# Altium PCB PCB3.PcbDoc (part 1 of 2)
Units mm, origin at the board's own origin, x right, y up, seen from the top; angles counter-clockwise.
Board outline 125 x 125 mm, 2 copper layers (Top Layer, Bottom Layer); 180 components, 111 nets, 575 pads, 155 vias.
Unrouted connection lines stored in the file: 143.
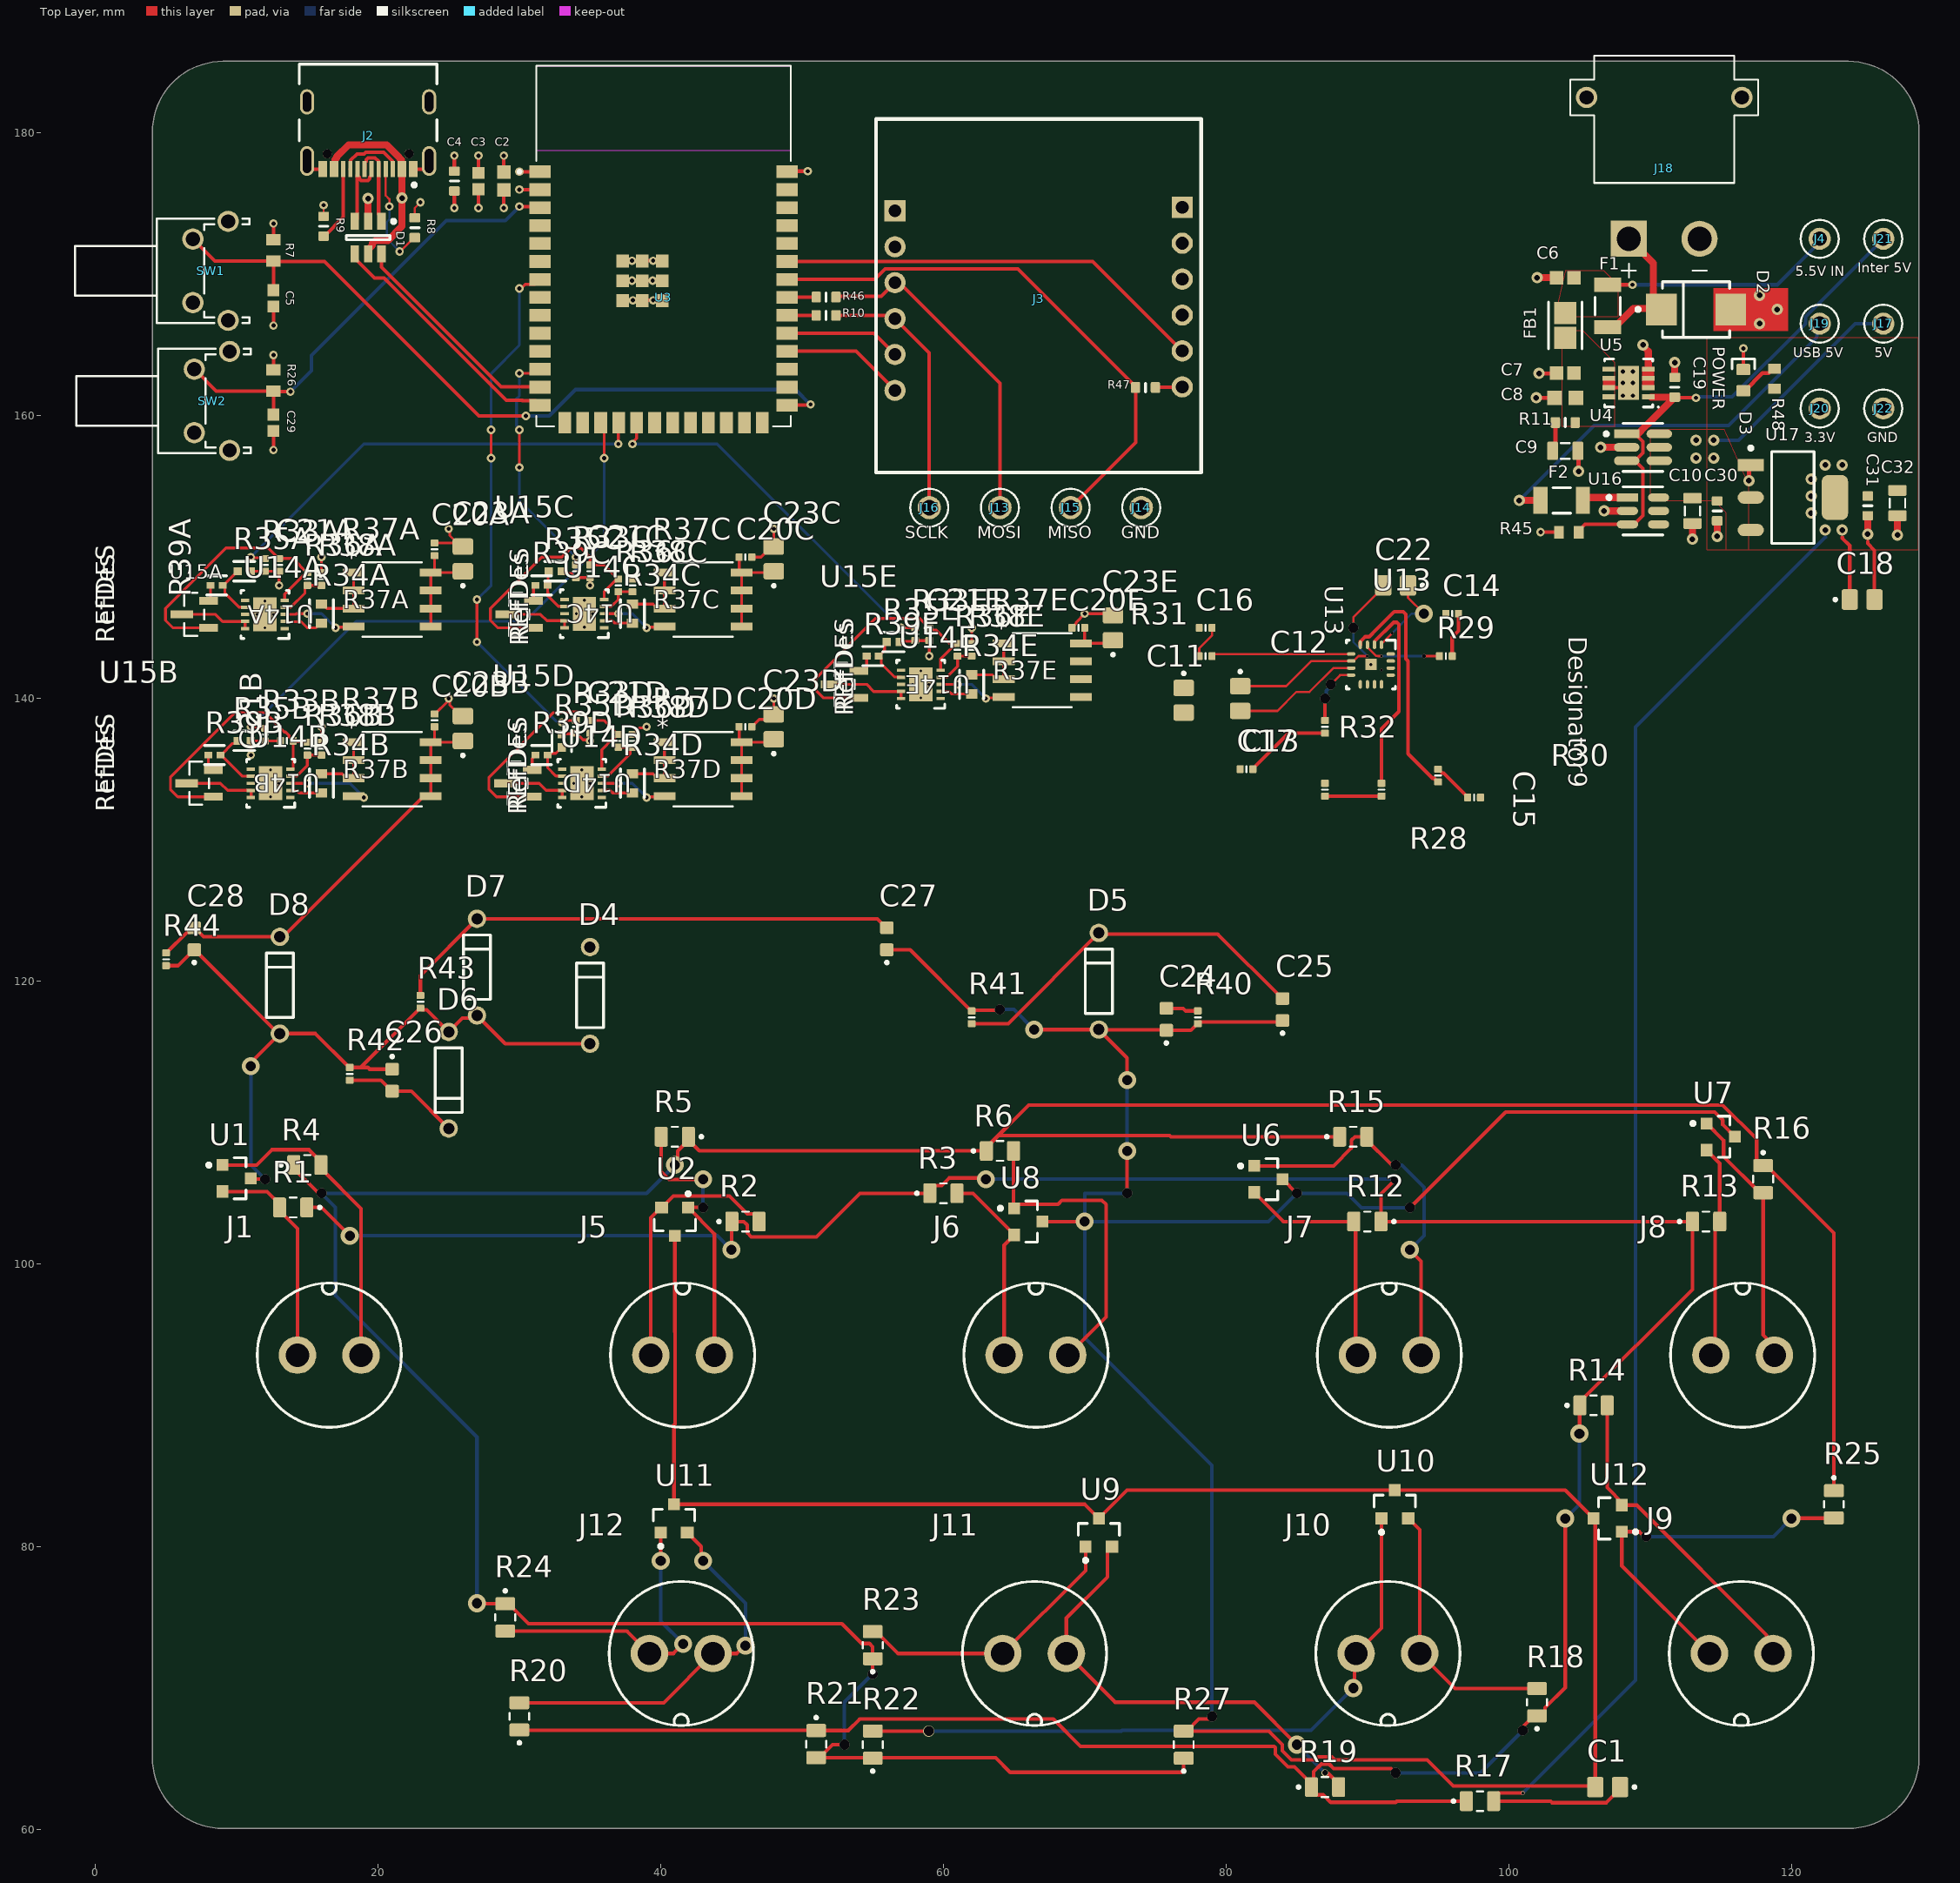
[diagram p0: Top Layer view]
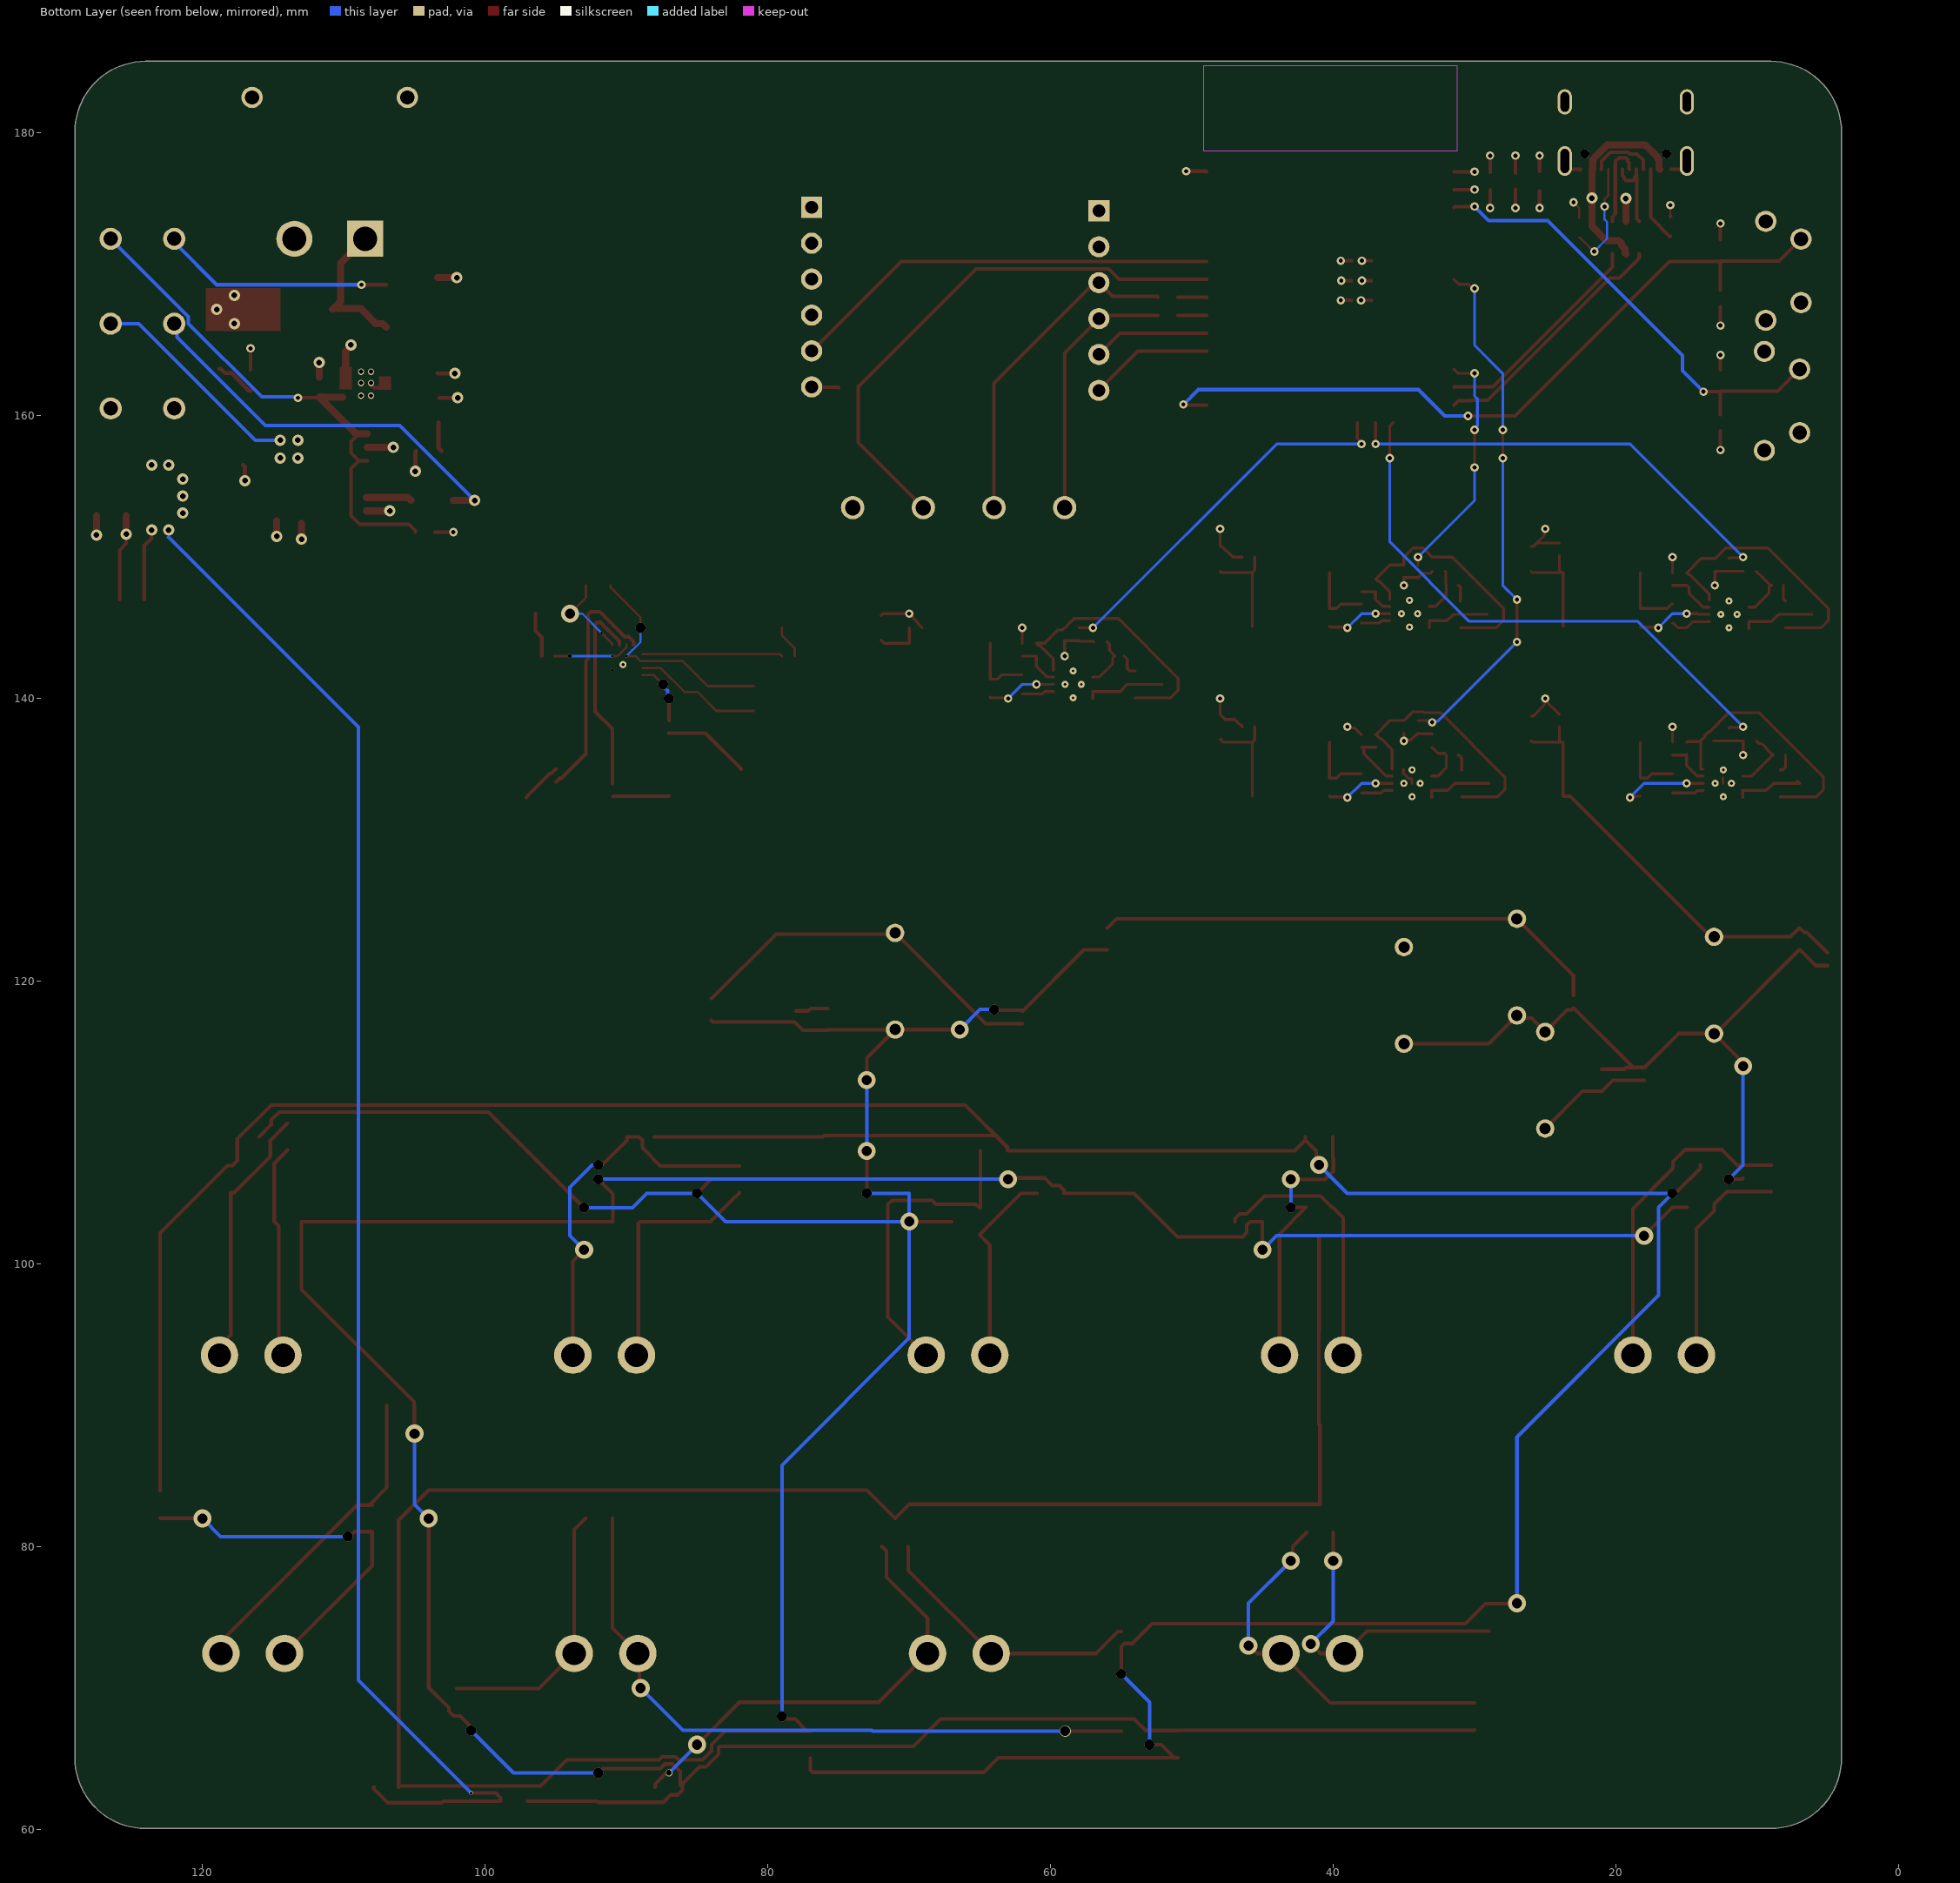
[diagram p1: Bottom Layer view, seen from below]

## Layer stack, top to bottom
Top Solder: solder mask 0.0102, Solder Resist, Dk 3.5
Top Layer: signal copper 0.0356
Dielectric 1: dielectric 0.32, FR-4, Dk 4.8
Bottom Layer: signal copper 0.0356
Bottom Solder: solder mask 0.0102, Solder Resist, Dk 3.5

## Board outline
4.032,65.071 4.032,180.071 cw(c9.032,180.071) 9.032,185.071 124.032,185.071 cw(c124.032,180.071) 129.032,180.071 129.032,65.071 cw(c124.032,65.071) 124.032,60.071 9.032,60.071 cw(c9.032,65.071)

## Design rules (kind name [scope] priority, off if disabled: settings)
Clearance U13 [InComponent('U13')] p1: gap=0.14 ignorepadtopadclearanceinfootprint=FALSE
Clearance [All] p2: gap=0.254 ignorepadtopadclearanceinfootprint=FALSE
DiffPairsRouting [All] p1: maxlimit=0.254 minlimit=0.254 mostfreqgap=0.254 toplayer_minwidth=0.381 toplayer_maxwidth=0.381 toplayer_prefwidth=0.381 bottomlayer_minwidth=0.381 bottomlayer_maxwidth=0.381 bottomlayer_prefwidth=0.381 maxuncoupledlength=12.7
FanoutControl Fanout_Default [All] p1: bgadir=Out bgaviamode=Centered fanoutstyle=Auto fanoutdirection=Alternating viagrid=0.025 // Fanout_Default (Default Rule)
FanoutControl Fanout_Small [(CompPinCount < 5)] p2: bgadir=Out bgaviamode=Centered fanoutstyle=Auto fanoutdirection=OutThenIn viagrid=0.025 // Fanout_Small (Default Rule)
FanoutControl Fanout_LCC [IsLCC] p4: bgadir=Out bgaviamode=Centered fanoutstyle=Auto fanoutdirection=Alternating viagrid=0.025 // Fanout_LCC (Default Rule)
FanoutControl Fanout_BGA [IsBGA] p5: bgadir=Out bgaviamode=Centered fanoutstyle=Auto fanoutdirection=Alternating viagrid=0.025 // Fanout_BGA (Default Rule)
PolygonConnect [All] p1: connectstyle=Relief reliefconductorwidth=0.254 reliefentries=4 polygonreliefangle="90 Angle" airgapwidth=0.254
RoutingVias [All] p1: holewidth=0.711 width=1.27 viastyle="Through Hole" minholewidth=0.711 minwidth=1.27 maxholewidth=0.711 maxwidth=1.27
SolderMaskExpansion [All] p1: expansion=0 istentingtop=FALSE
SupplyNets "Schematic Supply Nets_10" [InNet('GND')] p1: voltage=0.000
SupplyNets "Schematic Supply Nets_1" [InNet('5V')] p2: voltage=0.000
SupplyNets "Schematic Supply Nets_2" [InNet('24V')] p3: voltage=0.000
SupplyNets "Schematic Supply Nets_3" [InNet('5V5_IN')] p4: voltage=0.000
SupplyNets "Schematic Supply Nets_4" [InNet('USB_5V')] p5: voltage=0.000
SupplyNets "Schematic Supply Nets_5" [InNet('5V5')] p6: voltage=0.000
SupplyNets "Schematic Supply Nets_6" [InNet('+5')] p7: voltage=0.000
SupplyNets "Schematic Supply Nets_7" [InNet('+5V')] p8: voltage=0.000
SupplyNets "Schematic Supply Nets_8" [InNet('5V_INTER')] p9: voltage=0.000
SupplyNets "Schematic Supply Nets_9" [InNet('3.3V')] p10: voltage=0.000
Width [All] p1: maxlimit=0.254 minlimit=0.15 preferedwidth=0.16 minimp=50.000000 maximp=50.000000 favimp=50.000000
25 further rules are at their usual default settings.

## Classes and differential pairs
channel class MD-XTR-MOSFET: Designator1 Designator2 Designator3 Designator4 Designator5
component class U_Sheet1: C2 C3 C4 C5 C29 D1 J2 J3 J13 J14 J15 J16 R7 R8 R9 R10 R26 R46 R47 SW1 SW2 U3
component class Designator: C24 C25 C26 C27 C28 D4 D5 D6 D7 D8 R40 R41 R42 R43 R44
component class Designator5: C20E C21E C23E R33E R34E R35E R36E R37E R38E R39E U14E U15E
component class Designator4: C20D C21D C23D R33D R34D R35D R36D R37D R38D R39D U14D U15D
component class Designator3: C20C C21C C23C R33C R34C R35C R36C R37C R38C R39C U14C U15C
component class Designator2: C20B C21B C23B R33B R34B R35B R36B R37B R38B R39B U14B U15B
component class Designator1: C20A C21A C23A R33A R34A R35A R36A R37A R38A R39A U14A U15A
differential pair USB_D: +USB_D_P -USB_D_N

## Components (designator, comment, footprint, x,y, rotation, side; value= is the part's Value field where it differs from the comment)
C1 "Capacitor 220pF, 5%, 50V, C0G, 0805" PCC-001-0015-1 107,63 r180 top value=100nF
C2 "Capacitor 100 nF +/-10% 50 V 0603" CAPC1608X90X40NL10T20 28.9,176.6 r270 top value=100nF
C3 "Capacitor 1 uF +/- 10% 25 V 0603" CAPC1608X90X40LL10T20 27.1,176.6 r270 top value=1µF
C4 "Capacitor 10µF +/-20% 10V 0603" CAPC0603(1608)100_L 25.4,176.6 r270 top value=10µF
C5 "Capacitor 1 uF +/- 10% 25 V 0603" CAPC1608X90X40LL10T20 12.6,168.3 r270 top value=1µF
C6 "Capacitor 100 nF +/-10% 50 V 0603" CAPC1608X90X40NL10T20 104,169.767 r180 top value=100nF
C7 "Capacitor 100 nF +/-10% 50 V 0603" CAPC1608X90X40NL10T20 104,163.017 r180 top value=100nF
C8 "Capacitor 1 uF +/- 10% 16 V 0603" CAPC1608X94X35NL15T15 104,161.267 r180 top value=1µF
C9 "Capacitor 22µF +/-40% 16V 0805" CAPC0805(2012)145_L 104,157.517 r0 top value=22µF
C10 "Capacitor 22µF +/-40% 16V 0805" CAPC0805(2012)145_L 113,153.267 r270 top value=22µF
C11 "Capacitor 15uF, 20%, 35V, X5R, 0805" PCC-001-0015-1 77,139.875 r270 top value=100nF
C12 "Capacitor 15uF, 20%, 35V, X5R, 0805" PCC-001-0015-1 81,140 r270 top value=10uF
C13 "Capacitor 10nF +/-20% 50V 0402" CAPC0402(1005)60_L 87,133.55 r90 top value=10nF
C14 "Capacitor 10nF +/-20% 50V 0402" CAPC0402(1005)60_L 96,146 r180 top value=10nF
C15 "Capacitor 10nF +/-20% 50V 0402" CAPC0402(1005)60_L 97.55,133 r0 top value=10nF
C16 "Capacitor 10nF +/-20% 50V 0402" CAPC0402(1005)60_L 78.55,145 r180 top value=10nF
C17 "Capacitor 10nF +/-20% 50V 0402" CAPC0402(1005)60_L 81.45,135 r180 top value=10nF
C18 "Capacitor 15uF, 20%, 35V, X5R, 0805" PCC-001-0015-1 125,147 r0 top value=100nF
C19 "Capacitor 1µF +/-40% 50V 0603" CAPC0603(1608)100_L 111.75,162.017 r90 top value=1µF
C20A "Capacitor 10nF +/-20% 50V 0402" CAPC0402(1005)60_L 24,150.55 r90 top value=10nF (schematic designator C20)
C20B "Capacitor 10nF +/-20% 50V 0402" CAPC0402(1005)60_L 24,138.45 r90 top value=10nF (schematic designator C20)
C20C "Capacitor 10nF +/-20% 50V 0402" CAPC0402(1005)60_L 46,150 r0 top value=10nF (schematic designator C20)
C20D "Capacitor 10nF +/-20% 50V 0402" CAPC0402(1005)60_L 46,138 r0 top value=10nF (schematic designator C20)
C20E "Capacitor 10nF +/-20% 50V 0402" CAPC0402(1005)60_L 69.55,145 r180 top value=10nF (schematic designator C20)
C21A "Capacitor 470nF +/-40% 10V 0402" CAPC0402(1005)60_L 13,149.45 r270 top value=470nF (schematic designator C21)
C21B "Capacitor 470nF +/-40% 10V 0402" CAPC0402(1005)60_L 13.55,137 r180 top value=470nF (schematic designator C21)
C21C "Capacitor 470nF +/-40% 10V 0402" CAPC0402(1005)60_L 35,149 r270 top value=470nF (schematic designator C21)
C21D "Capacitor 470nF +/-40% 10V 0402" CAPC0402(1005)60_L 35,138 r270 top value=470nF (schematic designator C21)
C21E "Capacitor 470nF +/-40% 10V 0402" CAPC0402(1005)60_L 59,144.55 r270 top value=470nF (schematic designator C21)
C22 "Capacitor 15uF, 20%, 35V, X5R, 0805" PCC-001-0015-1 92,148 r180 top value=1uF
C23A "Capacitor 15uF, 20%, 35V, X5R, 0805" PCC-001-0015-1 26,149.875 r90 top value=100nF (schematic designator C23)
C23B "Capacitor 15uF, 20%, 35V, X5R, 0805" PCC-001-0015-1 26,137.875 r90 top value=100nF (schematic designator C23)
C23C "Capacitor 15uF, 20%, 35V, X5R, 0805" PCC-001-0015-1 48,149.875 r90 top value=100nF (schematic designator C23)
C23D "Capacitor 15uF, 20%, 35V, X5R, 0805" PCC-001-0015-1 48,138 r90 top value=100nF (schematic designator C23)
C23E "Capacitor 15uF, 20%, 35V, X5R, 0805" PCC-001-0015-1 72,145 r90 top value=100nF (schematic designator C23)
C24 "Capacitor 82pF, 5%, 50V, C0G, 0603" PCC-001-0014-1 75.777,117.305 r90 top value=100nF
C25 "Capacitor 82pF, 5%, 50V, C0G, 0603" PCC-001-0014-1 84,118 r90 top value=100nF
C26 "Capacitor 82pF, 5%, 50V, C0G, 0603" PCC-001-0014-1 21,113 r270 top value=100nF
C27 "Capacitor 82pF, 5%, 50V, C0G, 0603" PCC-001-0014-1 56,123 r90 top value=100nF
C28 "Capacitor 82pF, 5%, 50V, C0G, 0603" PCC-001-0014-1 7,123 r90 top value=100nF
C29 "Capacitor 1 uF +/- 10% 25 V 0603" CAPC1608X90X40LL10T20 12.6,159.5 r270 top value=1µF
C30 "Capacitor 1µF +/-40% 50V 0603" CAPC0603(1608)100_L 114.75,153.267 r270 top value=1µF
C31 "Capacitor 1µF +/-40% 50V 0603" CAPC0603(1608)100_L 125.403,153.626 r270 top value=1µF
C32 "Capacitor 22µF +/-40% 16V 0805" CAPC0805(2012)145_L 127.5,153.817 r270 top value=22µF
D1 "USBLC6-2SC6" STM-SOT23-6L_V 19.3,172.6 r270 top
D2 "SMBJ6.0A" FP-SMBJ-MFG 113.25,167.517 r0 top
D3 "LED_0603_RED" LED_0603_RED 116.6,162.517 r270 top
D4 "BZX79C3V6" FAIR-DO-35-2 35,119 r90 top
D5 "BZX79C3V6" FAIR-DO-35-2 71,120 r90 top
D6 "BZX79C3V6" FAIR-DO-35-2 25,113 r270 top
D7 "BZX79C3V6" FAIR-DO-35-2 27,121 r90 top
D8 "BZX79C3V6" FAIR-DO-35-2 13.055,119.718 r90 top
F1 "0ZCJ0050FF2G" FP-0ZCJ0050FF2G-MFG 107,167.767 r90 top
F2 "0ZCJ0050FF2G" FP-0ZCJ0050FF2G-MFG 103.75,154.017 r0 top
FB1 "MPZ2012S331AT000" FP-MPZ2012-IPC_A 104,166.391 r270 top value=50mΩ
J1 "GX12-2 Jack" PCC-001-0161-1 16.55,93.55 r0 top
J2 "USB4105-GF-A" FP-USB4105-GF-A-MFG 19.295,181.035 r180 top
J3 "W5500 SPI to LAN Breakout" "W5500 SPI to LAN Breakout-Footprint-1" 55.24,155.995 r0 top
J4 "5001" FP-5001-MFG#1 122,172.517 r0 top
J5 "GX12-2 Jack" PCC-001-0161-1 41.55,93.55 r0 top
J6 "GX12-2 Jack" PCC-001-0161-1 66.55,93.55 r0 top
J7 "GX12-2 Jack" PCC-001-0161-1 91.55,93.55 r0 top
J8 "GX12-2 Jack" PCC-001-0161-1 116.55,93.55 r0 top
J9 "GX12-2 Jack" PCC-001-0161-1 116.45,72.45 r180 top
J10 "GX12-2 Jack" PCC-001-0161-1 91.45,72.45 r180 top
J11 "GX12-2 Jack" PCC-001-0161-1 66.45,72.45 r180 top
J12 "GX12-2 Jack" PCC-001-0161-1 41.45,72.45 r180 top
J13 "5001" FP-5001-MFG#2 64,153.5 r0 top
J14 "5001" FP-5001-MFG#2 74,153.5 r0 top
J15 "5001" FP-5001-MFG#2 69,153.5 r0 top
J16 "5001" FP-5001-MFG#2 59,153.5 r0 top
J17 "5001" FP-5001-MFG#1 126.5,166.517 r0 top
J18 "XT30PW-M" AMASS_XT30PW-M 111,182.517 r0 top
J19 "5001" FP-5001-MFG#1 122,166.517 r0 top
J20 "5001" FP-5001-MFG#1 122,160.517 r0 top
J21 "5001" FP-5001-MFG#1 126.5,172.517 r0 top
J22 "5001" FP-5001-MFG#1 126.5,160.517 r0 top
R1 "Resistor 750R, 0.1%, 1/8W, 0805" PCC-001-0067-1 14,104 r180 top value=10
R2 "Resistor 750R, 0.1%, 1/8W, 0805" PCC-001-0067-1 46,103 r0 top value=10
R3 "Resistor 750R, 0.1%, 1/8W, 0805" PCC-001-0067-1 60,105 r0 top value=10
R4 "Resistor 750R, 0.1%, 1/8W, 0805" PCC-001-0067-1 15,107 r0 top value=10
R5 "Resistor 750R, 0.1%, 1/8W, 0805" PCC-001-0067-1 41,109 r180 top value=10
R6 "Resistor 750R, 0.1%, 1/8W, 0805" PCC-001-0067-1 64,108 r0 top value=10
R7 "Resistor 10k +/-1% 0603 100 mW" RESC1608X55X25ML10T15 12.6,171.7 r90 top value=10k
R8 "Resistor 5.1k +/-1% 0603 100 mW" RESC0603(1608)_L 22.6,173.3 r90 top value=5K1
R9 "Resistor 5.1k +/-1% 0603 100 mW" RESC0603(1608)_L 16.15,173.4 r90 top value=5K1
R10 "0R3J" RESC0603(1608)_L 51.7,167.1 r180 top value=0
R11 "0R3J" RESC0603(1608)_L 104,159.517 r180 top value=0
R12 "Resistor 750R, 0.1%, 1/8W, 0805" PCC-001-0067-1 90,103 r180 top value=10
R13 "Resistor 750R, 0.1%, 1/8W, 0805" PCC-001-0067-1 113.963,103 r0 top value=10
R14 "Resistor 750R, 0.1%, 1/8W, 0805" PCC-001-0067-1 106,90 r0 top value=10
R15 "Resistor 750R, 0.1%, 1/8W, 0805" PCC-001-0067-1 89,109 r0 top value=10
R16 "Resistor 750R, 0.1%, 1/8W, 0805" PCC-001-0067-1 118,106 r270 top value=10
R17 "Resistor 750R, 0.1%, 1/8W, 0805" PCC-001-0067-1 97.962,62 r0 top value=1k
R18 "Resistor 750R, 0.1%, 1/8W, 0805" PCC-001-0067-1 102,69 r90 top value=10
R19 "Resistor 750R, 0.1%, 1/8W, 0805" PCC-001-0067-1 87,63 r0 top value=10
R20 "Resistor 750R, 0.1%, 1/8W, 0805" PCC-001-0067-1 30,68 r90 top value=10
R21 "Resistor 750R, 0.1%, 1/8W, 0805" PCC-001-0067-1 51,66.038 r270 top value=120
R22 "Resistor 750R, 0.1%, 1/8W, 0805" PCC-001-0067-1 55,66 r90 top value=10
R23 "Resistor 750R, 0.1%, 1/8W, 0805" PCC-001-0067-1 55,73.037 r90 top value=10
R24 "Resistor 750R, 0.1%, 1/8W, 0805" PCC-001-0067-1 29,75 r270 top value=10
R25 "Resistor 750R, 0.1%, 1/8W, 0805" PCC-001-0067-1 123,83 r270 top value=10
R26 "Resistor 10k +/-1% 0603 100 mW" RESC1608X55X25ML10T15 12.6,162.5 r90 top value=10k
R27 "Resistor 750R, 0.1%, 1/8W, 0805" PCC-001-0067-1 77,66 r90 top value=1k
R28 "Resistor 1K +/-5 % 0402 63 mW" RESC0402(1005)_L 91,133.55 r270 top value=1k
R29 "Resistor 1K +/-5 % 0402 63 mW" RESC0402(1005)_L 95.55,143 r0 top value=1k
R30 "Resistor 1K +/-5 % 0402 63 mW" RESC0402(1005)_L 95,134.55 r90 top value=1k
R31 "Resistor 1K +/-5 % 0402 63 mW" RESC0402(1005)_L 78.55,143 r180 top value=1k
R32 "Resistor 1K +/-5 % 0402 63 mW" RESC0402(1005)_L 87,138 r270 top value=1k
R33A "10KR2F" RESC0402(1005)_L 12,149.45 r90 top value=10k (schematic designator R33)
R33B "10KR2F" RESC0402(1005)_L 12,137.45 r90 top value=10k (schematic designator R33)
R33C "10KR2F" RESC0402(1005)_L 34,149 r90 top value=10k (schematic designator R33)
R33D "10KR2F" RESC0402(1005)_L 34,138 r90 top value=10k (schematic designator R33)
R33E "10KR2F" RESC0402(1005)_L 58,144.55 r90 top value=10k (schematic designator R33)
R34A "15 ohm" FP-AF0603-IPC_C 16,146 r90 top (schematic designator R34)
R34B "15 ohm" FP-AF0603-IPC_C 16,134 r90 top (schematic designator R34)
R34C "15 ohm" FP-AF0603-IPC_C 38,146 r90 top (schematic designator R34)
R34D "15 ohm" FP-AF0603-IPC_C 38,134 r90 top (schematic designator R34)
R34E "15 ohm" FP-AF0603-IPC_C 62,141 r90 top (schematic designator R34)
R35A "2k ohm" FP-RN73R1E-IPC_B 10.536,149 r0 top (schematic designator R35)
R35B "2k ohm" FP-RN73R1E-IPC_B 10.536,137 r0 top (schematic designator R35)
R35C "2k ohm" FP-RN73R1E-IPC_B 32.536,149 r0 top (schematic designator R35)
R35D "2k ohm" FP-RN73R1E-IPC_B 33,137 r90 top (schematic designator R35)
R35E "2k ohm" FP-RN73R1E-IPC_B 56.464,144 r0 top (schematic designator R35)
R36A "Resistor 2K +/-5 % 0402 63 mW" RESC0402(1005)_L 15,148.45 r270 top value=2k (schematic designator R36)
R36B "Resistor 2K +/-5 % 0402 63 mW" RESC0402(1005)_L 15,136.45 r270 top value=2k (schematic designator R36)
R36C "Resistor 2K +/-5 % 0402 63 mW" RESC0402(1005)_L 37,148 r270 top value=2k (schematic designator R36)
R36D "Resistor 2K +/-5 % 0402 63 mW" RESC0402(1005)_L 37,137 r270 top value=2k (schematic designator R36)
R36E "Resistor 2K +/-5 % 0402 63 mW" RESC0402(1005)_L 61,143.45 r270 top value=2k (schematic designator R36)
R37A "RRH100P03GZETB" TRANS_RRH040P_ROM 21,147 r0 top (schematic designator R37)
R37B "RRH100P03GZETB" TRANS_RRH040P_ROM 21,135 r0 top (schematic designator R37)
R37C "RRH100P03GZETB" TRANS_RRH040P_ROM 43,147 r0 top (schematic designator R37)
R37D "RRH100P03GZETB" TRANS_RRH040P_ROM 43,135 r0 top (schematic designator R37)
R37E "RRH100P03GZETB" TRANS_RRH040P_ROM 67,142 r0 top (schematic designator R37)
R38A "Resistor 3K +/-1 % 0402 63 mW" RESC0402(1005)_L 16,148.45 r90 top value=3k (schematic designator R38)
R38B "Resistor 3K +/-1 % 0402 63 mW" RESC0402(1005)_L 16,136.45 r90 top value=3k (schematic designator R38)
R38C "Resistor 3K +/-1 % 0402 63 mW" RESC0402(1005)_L 38,148 r90 top value=3k (schematic designator R38)
R38D "Resistor 3K +/-1 % 0402 63 mW" RESC0402(1005)_L 38,137 r90 top value=3k (schematic designator R38)
R38E "Resistor 3K +/-1 % 0402 63 mW" RESC0402(1005)_L 62,143.45 r90 top value=3k (schematic designator R38)
R39A "820K ohm" FP-CRGP0402-IPC_C 8.574,148 r0 top value=820KΩ (schematic designator R39)
R39B "820K ohm" FP-CRGP0402-IPC_C 8.426,136 r0 top value=820KΩ (schematic designator R39)
R39C "820K ohm" FP-CRGP0402-IPC_C 31.574,148 r0 top value=820KΩ (schematic designator R39)
R39D "820K ohm" FP-CRGP0402-IPC_C 31.574,136 r0 top value=820KΩ (schematic designator R39)
R39E "820K ohm" FP-CRGP0402-IPC_C 55,143 r0 top value=820KΩ (schematic designator R39)
R40 "316KR2F" RESC0402(1005)_L 78,117.45 r90 top value=150
R41 "316KR2F" RESC0402(1005)_L 62,117.45 r270 top value=150
R42 "316KR2F" RESC0402(1005)_L 18,113.45 r270 top value=150
R43 "316KR2F" RESC0402(1005)_L 23,118.55 r90 top value=150
R44 "316KR2F" RESC0402(1005)_L 5,121.55 r90 top value=150
R45 "Resistor 100k +/-1% 0603 100 mW" RESC1608X55X25NL10T15 104.25,151.767 r180 top value=100k
R46 "0R3J" RESC0603(1608)_L 51.7,168.4 r180 top value=0
R47 "0R3J" RESC0603(1608)_L 74.3,162 r180 top value=0
R48 "Resistor 470R +/-1% 0603 100 mW" RESC1608X55X25NL10T15 118.8,162.617 r90 top value=470
SW1 "431256083716" 4312560837x6 6.025,170.25 r270 top
SW2 "431256083716" 4312560837x6 6.125,161.05 r270 top
U1 "PSM712-LF-T7" PRKT-SOT23-3_V 10,106.06 r0 top
U2 "PSM712-LF-T7" PRKT-SOT23-3_V 41,103 r270 top
U3 "ESP32-S3-WROOM-1-N16R2" XCVR_ESP32-S3-WROOM-1-N16R2 40.203,172.003 r0 top
U4 "TPS22917DBVR" FP-DBV0006A-IPC_A 109.5,157.767 r0 top
U5 "TPS7A2150PQWDRBRQ1" SON65P300X100_HS-9N 108.48,162.317 r180 top
U6 "PSM712-LF-T7" PRKT-SOT23-3_V 83,106 r0 top
U7 "PSM712-LF-T7" PRKT-SOT23-3_V 115,109 r0 top
U8 "PSM712-LF-T7" PRKT-SOT23-3_V 66,103 r0 top
U9 "PSM712-LF-T7" PRKT-SOT23-3_V 71,81 r90 top
U10 "PSM712-LF-T7" PRKT-SOT23-3_V 91.94,83 r90 top
U11 "PSM712-LF-T7" PRKT-SOT23-3_V 40.94,82 r90 top
U12 "PSM712-LF-T7" PRKT-SOT23-3_V 107,82 r180 top
U13 "DAC80508ZCRTER" RTE0016D 90.25,142.4 r270 top
U14A "XTR111AIDRCR" DRC0010A 12,145.95 r180 top (schematic designator U14)
U14B "XTR111AIDRCR" DRC0010A 12.4,134 r180 top (schematic designator U14)
U14C "XTR111AIDRCR" DRC0010A 34.6,146 r180 top (schematic designator U14)
U14D "XTR111AIDRCR" DRC0010A 34.425,134 r180 top (schematic designator U14)
U14E "XTR111AIDRCR" DRC0010A 58.4,141 r180 top (schematic designator U14)
U15A "REF3040AIDBZT" DBZ3 7,145.95 r90 top (schematic designator U15)
U15B "REF3040AIDBZT" DBZ3 7.346,134 r90 top (schematic designator U15)
U15C "REF3040AIDBZT" DBZ3 29.984,145.95 r90 top (schematic designator U15)
U15D "REF3040AIDBZT" DBZ3 29.883,134 r90 top (schematic designator U15)
U15E "REF3040AIDBZT" DBZ3 53,141 r90 top (schematic designator U15)
U16 "TPS22917LDBVR" FP-DBV0006A-IPC_B 109.5,153.267 r0 top
U17 "AZ1117CH-3.3TRG1" FP-SOT223-IPC_B 120.1,154.217 r0 top

## Footprints (in the part's own frame and the unit in brackets; to place one, negate y for a bottom-side part, rotate by r counter-clockwise, add the part's x,y. Pads: shape width x height; smd on the part's side, far side on the other; paste and mask are expansions set on the pad)
4312560837x6 [mm] "6x6mm right angle Tact Switch with ground terminal, THT version"
  round 1.5 hole 1: 1(-2.25,0.875) 2(2.25,0.875) G1(-3.5,3.375) G2(3.5,3.375)
  silkscreen extent -3.7,-7.48 3.7,4.87, body extent -4.2,-7.48 4.2,4.87, height 7.25
AMASS_XT30PW-M [mm]
  round 2.55 hole 1.7: N(2.5,-10)
  rect 2.55x2.55 / inner round 2.55 / far side rect 2.55x2.55 hole 1.7: P(-2.5,-10)
  round 1.508 hole 1: S1(5.5,0) S2(-5.5,0)
  silkscreen extent -6.65,-12.75 6.65,2.95, body extent -6.65,-11 6.65,2.95, height 5
CAPC0402(1005)60_L [mm] "Chip Capacitor, Body 1.0x0.5mm, Height 0.6mm, IPC High Density"
  rrect25% 0.5x0.55 smd: 1(-0.45,0) 2(0.45,0)
  silkscreen extent 0,-0.2 0,0.2, body extent -0.5,-0.25 0.5,0.25, height 0.6
CAPC0603(1608)100_L [mm] "Chip Capacitor, Body 1.6x0.8mm, Height 1.0mm, IPC High Density"
  rrect25% 0.66x0.76 smd: 1(-0.7,0) 2(0.7,0)
  silkscreen extent 0,-0.3 0,0.3, body extent -0.8,-0.4 0.8,0.4, height 0.95
CAPC0805(2012)145_L [mm] "Chip Capacitor, Body 2.0x1.2mm, Height 1.45mm, IPC High Density"
  rrect25% 0.76x1.3 smd: 1(-0.9,0) 2(0.89,0)
  silkscreen extent -0.3,-0.55 0.3,0.55, body extent -1,-0.6 1,0.6, height 1.45
CAPC1608X90X40LL10T20 [mm] "Chip Capacitor, 2-Leads, Body 1.70x0.90mm, IPC High Density"
  rect 0.85x0.85 smd: 1(-0.575,0) 2(0.575,0)
  body extent -0.85,-0.45 0.85,0.45, height 0.9
CAPC1608X90X40NL10T20 [mm] "Chip Capacitor, 2-Leads, Body 1.70x0.90mm, IPC Medium Density"
  rect 0.95x0.95 smd: 1(-0.625,0) 2(0.625,0)
  body extent -0.85,-0.45 0.85,0.45, height 0.9
CAPC1608X94X35NL15T15 [mm] "Chip Capacitor, 2-Leads, Body 1.75x0.96mm, IPC Medium Density"
  rect 1.05x1 smd: 1(-0.75,0) 2(0.75,0)
  body extent -0.87,-0.48 0.87,0.48, height 0.94
DBZ3 [mil]
  rect 22x52 smd paste-26 mask-26: 1(-37.4,-40) 2(37.4,-40)
  rect 22x62.5 smd paste-31.25 mask-31: 3(0,34.75)
  silkscreen extent -60,-28 60,28, body extent -60,-27 60,27, height 44
DRC0010A [mm]
  rect 0.6x0.24 smd paste+0 mask+0.051: 1(-1.4,1) 2(-1.4,0.5) 3(-1.4,0) 4(-1.4,-0.5) 5(-1.4,-1) 6(1.4,-1) 7(1.4,-0.5) 8(1.4,0) 9(1.4,0.5) 10(1.4,1)
  rect 1.65x2.4 smd paste-1.187 mask+0.051: 11(0,0)
  round 0.5 hole 0.203 paste-2539.97 mask+0.051: V(-0.575,0) V(0,0.95) V(0,-0.95) V(0.575,0)
  silkscreen extent -1.7,-1.7 1.7,1.7
FAIR-DO-35-2 [mm] "TH, 2-Leads, Dia 1.91mm"
  round 1.3 hole 0.8: 1(-3.42,0) 2(3.42,0)
  silkscreen extent -2.28,-0.95 2.28,0.95, body extent -3.7,-0.95 3.7,0.95, height 1.91
FP-0ZCJ0050FF2G-MFG [mm]
  rect 1x1.9 smd paste+0 mask+0: 1(-1.5,0) 2(1.5,0)
  silkscreen extent -0.63,-0.9 0.63,0.9, body extent -2.1,-1.05 2.1,1.05, height 0.25
FP-5001-MFG#1 [mm]
  round 1.57 hole 1.016 paste-2539.97 mask+0: 1(0,0)
  silkscreen extent -1.35,-1.34 1.35,1.34, body extent -1.45,-1.45 1.45,1.45, height 0.25
FP-5001-MFG#2 [mm]
  round 1.651 hole 1.092 paste-2539.97 mask+0: 1(0,0)
  silkscreen extent -1.35,-1.34 1.35,1.34, body extent -1.45,-1.45 1.45,1.45, height 0.25
FP-AF0603-IPC_C [mm]
  rect 0.659x0.812 smd paste+0 mask+0: 1(-0.677,0) 2(0.677,0)
  silkscreen extent -1.01,-0.85 1.01,0.85, body extent -1.11,-0.55 1.11,0.55, height 0.25
FP-CRGP0402-IPC_C [mm]
  rect 0.56x0.472 smd paste+0 mask+0: 1(-0.426,0) 2(0.426,0)
  silkscreen extent -0.71,-0.67 0.71,0.67, body extent -0.81,-0.38 0.81,0.38, height 0.25
FP-DBV0006A-IPC_A [mm]
  rect 1.805x0.61 smd paste+0 mask+0: 1(-1.15,0.95)
  rrect100% 1.805x0.61 smd paste+0 mask+0: 2(-1.15,0) 3(-1.15,-0.95) 4(1.15,-0.95) 5(1.15,0) 6(1.15,0.95)
  silkscreen extent -2.73,-1.7 1.4,1.7, body extent -2.55,-1.95 2.55,1.95, height 0.25
FP-DBV0006A-IPC_B [mm]
  rect 1.505x0.57 smd paste+0 mask+0: 1(-1.1,0.95)
  rrect100% 1.505x0.57 smd paste+0 mask+0: 2(-1.1,0) 3(-1.1,-0.95) 4(1.1,-0.95) 5(1.1,0) 6(1.1,0.95)
  silkscreen extent -2.53,-1.7 1.4,1.7, body extent -2.1,-1.7 2.1,1.7, height 0.25
FP-MPZ2012-IPC_A [mm]
  rect 1.554x1.556 smd paste+0 mask+0: 1(-0.876,0) 2(0.876,0)
  silkscreen extent -1.65,-1.18 1.65,1.18, body extent -2.15,-1.28 2.15,1.28, height 0.25
FP-RN73R1E-IPC_B [mm]
  rect 0.588x0.572 smd paste+0 mask+0: 1(-0.464,0) 2(0.464,0)
  silkscreen extent -0.76,-0.69 0.76,0.69, body extent -0.91,-0.44 0.91,0.44, height 0.25
FP-SMBJ-MFG [mm]
  rect 2.16x2.26 smd paste+0 mask+0: 1(-2.45,0) 2(2.45,0)
  silkscreen extent -4.22,-1.97 2.37,1.97, body extent -3.63,-2.07 3.63,2.07, height 0.25
FP-SOT223-IPC_B [mm]
  rect 1.86x0.872 smd paste+0 mask+0: 1(-2.976,2.3)
  rrect100% 1.86x0.872 smd paste+0 mask+0: 2(-2.976,0) 3(-2.976,-2.3)
  rrect47% 1.86x3.172 smd paste+0 mask+0: 4(2.976,0)
  silkscreen extent -3.1,-3.25 1.5,3.62, body extent -4.16,-3.5 4.16,3.5, height 0.25
FP-USB4105-GF-A-MFG [mm]
  rrect100% 1x2.1 hole 1.7 slot 0.6 at 0 deg paste-2539.97 mask+0: 1(-4.32,3.015) 2(4.32,3.015)
  rrect100% 1x1.8 hole 1.4 slot 0.6 at 0 deg paste-2539.97 mask+0: 3(-4.32,-1.165) 4(4.32,-1.165)
  rect 0.6x1.15 smd paste+0 mask+0: A1-B12(-3.2,3.59) A4-B9(-2.4,3.59) B1-A12(3.2,3.59) B4-A9(2.4,3.59)
  rect 0.3x1.15 smd paste+0 mask+0: A5(-1.25,3.59) A6(-0.25,3.59) A7(0.25,3.59) A8(1.25,3.59) B5(1.75,3.59) B6(0.75,3.59) B7(-0.75,3.59) B8(-1.75,3.59)
  round 0.65 hole 0.65 unplated paste-2539.97 mask+0: ""(-2.89,2.515) ""(2.89,2.515)
  silkscreen extent -4.86,-3.84 4.86,4.84, body extent -4.96,-3.94 4.96,4.27, height 0.25
LED_0603_RED [mm]
  rrect25% 0.8x1 smd: A(0.75,0) K(-0.75,0)
  silkscreen extent -1.5,-0.8 -0.8,0.8, body extent -0.8,-0.4 0.8,0.4, height 0.6
PCC-001-0014-1 [mm] "CAPC 1.6 x 0.8 mm; IPC-7351B density B"
  rrect25% 0.9x0.95 smd: 1(-0.775,0) 2(0.775,0)
  silkscreen extent -1.77,-0.1 -1.58,0.1
PCC-001-0015-1 [mm] "CAPC 2.0 x 1.25 mm; IPC-7351B density B"
  rrect25% 1.15x1.45 smd: 1(-0.875,0) 2(0.875,0)
  silkscreen extent -2,-0.1 -1.8,0.1
PCC-001-0067-1 [mm] "RESC 2.0 x 1.25 mm; IPC-7351B density B"
  rrect25% 0.925x1.4 smd: 1(-0.962,0) 2(0.962,0)
  silkscreen extent -1.97,-0.7 0.23,0.7
PCC-001-0161-1 [mm]
  round 2.65 hole 1.65: 1(-2.25,0) 2(2.25,0)
  silkscreen extent -5.1,-5.1 5.1,5.1
PRKT-SOT23-3_V [mm] "SOT23, 3-Leads, Body 2.92x1.3mm, Pitch 0.94mm"
  rect 0.84x0.84 smd: 1(-1,0.94) 3(1,0)
  rect 0.84x0.9 smd: 2(-1,-0.94)
  silkscreen extent -2.09,-1.46 0.65,1.46, body extent -0.65,-1.46 0.65,1.46, height 1.17
RESC0402(1005)_L [mm] "Chip Resistor, Body 1.0x0.5mm, IPC High Density"
  rrect25% 0.5x0.55 smd: 1(-0.45,0) 2(0.45,0)
  silkscreen extent 0,-0.2 0,0.2, body extent -0.5,-0.25 0.5,0.25, height 0.3
RESC0603(1608)_L [mm] "Chip Resistor, Body 1.6x0.8mm, IPC High Density"
  rrect25% 0.66x0.76 smd: 1(-0.7,0) 2(0.7,0)
  silkscreen extent 0,-0.3 0,0.3, body extent -0.8,-0.4 0.8,0.4, height 0.45
RESC1608X55X25ML10T15 [mm] "Chip Resistor, 2-Leads, Body 1.70x0.90mm, IPC Low Density"
  rect 0.8x1 smd: 1(-0.75,0) 2(0.75,0)
  body extent -0.85,-0.45 0.85,0.45, height 0.55
RESC1608X55X25NL10T15 [mm] "Chip Resistor, 2-Leads, Body 1.70x0.90mm, IPC Medium Density"
  rect 0.7x0.9 smd: 1(-0.7,0) 2(0.7,0)
  body extent -0.85,-0.45 0.85,0.45, height 0.55
RTE0016D [mm]
  oval 0.6x0.24 smd paste+0 mask+0.051: 1(-1.4,0.75) 2(-1.4,0.25) 3(-1.4,-0.25) 4(-1.4,-0.75) 9(1.4,-0.75) 10(1.4,-0.25) 11(1.4,0.25) 12(1.4,0.75)
  oval 0.24x0.6 smd paste+0 mask+0.051: 5(-0.75,-1.4) 6(-0.25,-1.4) 7(0.25,-1.4) 8(0.75,-1.4) 13(0.75,1.4) 14(0.25,1.4) 15(-0.25,1.4) 16(-0.75,1.4)
  rect 0.8x0.8 smd paste-0.387 mask+0.051: 17(0,0)
  round 0.5 hole 0.203 paste-2539.97 mask+0.051: V(0,0)
  silkscreen extent -1.72,-1.73 1.72,1.73
SON65P300X100_HS-9N [mm] "SON, 8-Leads, Body 3.00x3.00mm, Pitch 0.65mm, Thermal Pad 2.40x1.49mm, IPC Medium Density"
  rect 0.9x0.35 smd: 1(-1.395,0.975) 2(-1.395,0.325) 3(-1.395,-0.325) 4(-1.395,-0.975) 5(1.395,-0.975) 6(1.395,-0.325) 7(1.395,0.325) 8(1.395,0.975)
  rect 1.49x2.4 smd: 9(0,0)
  silkscreen extent -2.15,-1.7 1.7,1.75, body extent -1.63,-1.55 1.63,1.55, height 1
STM-SOT23-6L_V [mm] "SOT23, 6-Leads, Body 3.05x1.75mm, Pitch 0.95mm"
  rect 1.2x0.6 smd: 1(-1.15,0.95) 2(-1.15,0) 3(-1.15,-0.95) 4(1.15,-0.95) 5(1.15,0) 6(1.15,0.95)
  silkscreen extent -1.27,-1.55 0.15,1.93, body extent -1.6,-1.53 1.6,1.53, height 1.45
TRANS_RRH040P_ROM [mil]
  rect 61x22 smd paste+0 mask+0: 1(-107.5,75) 2(-107.5,25) 3(-107.5,-25) 4(-107.5,-75) 5(107.5,-75) 6(107.5,-25) 7(107.5,25) 8(107.5,75)
  silkscreen extent -82,-104 82,104, body extent -124,-99 124,99, height 69
"W5500 SPI to LAN Breakout-Footprint-1" [mm]
  rect 1.5x1.5 hole 0.9: 1(1.34,18.5) 12(21.66,18.75)
  round 1.5 hole 0.9: 2(1.34,15.96) 3(1.34,13.42) 4(1.34,10.88) 5(1.34,8.34) 6(1.34,5.8) 7(21.66,6.05) 8(21.66,8.59) 9(21.66,11.13) 10(21.66,13.67) 11(21.66,16.21)
  silkscreen extent 0,0 23,25, body extent 0,0 23,29, height 19.05
XCVR_ESP32-S3-WROOM-1-N16R2 [mm]
  rect 1.5x0.9 smd: 2(-8.75,3.99) 3(-8.75,2.72) 4(-8.75,1.45) 5(-8.75,0.18) 6(-8.75,-1.09) 7(-8.75,-2.36) 8(-8.75,-3.63) 9(-8.75,-4.9) 10(-8.75,-6.17) 11(-8.75,-7.44) 12(-8.75,-8.71) 13(-8.75,-9.98) 14(-8.75,-11.25) 27(8.75,-11.25) 28(8.75,-9.98) 29(8.75,-8.71) 30(8.75,-7.44) 31(8.75,-6.17) 32(8.75,-4.9) 33(8.75,-3.63) 34(8.75,-2.36) 35(8.75,-1.09) 36(8.75,0.18) 37(8.75,1.45) 38(8.75,2.72) 39(8.75,3.99) GND(-8.75,5.26) GND(8.75,5.26)
  rect 0.9x1.5 smd: 15(-6.985,-12.5) 16(-5.715,-12.5) 17(-4.445,-12.5) 18(-3.175,-12.5) 19(-1.905,-12.5) 20(-0.635,-12.5) 21(0.635,-12.5) 22(1.905,-12.5) 23(3.175,-12.5) 24(4.445,-12.5) 25(5.715,-12.5) 26(6.985,-12.5)
  rect 0.9x0.9 smd: GND(-2.9,-3.86) GND(-2.9,-2.46) GND(-2.9,-1.06) GND(-1.5,-3.86) GND(-1.5,-2.46) GND(-1.5,-1.06) GND(-0.1,-3.86) GND(-0.1,-2.46) GND(-0.1,-1.06)
  Keep-Out Layer region: 9,6.75 -9,6.75 -9,12.75 9,12.75
  Keep-Out Layer region: 9,6.75 -9,6.75 -9,12.75 9,12.75
  silkscreen extent -10.3,-12.75 9,12.75, body extent -9,-12.75 9,12.75, height 3.25

## Part data
C1: library part "Capacitor 220pF, 5%, 50V, C0G, 0805-1", "Capacitor, ceramic, 220pF, 5%, 50V, C0G, 0805", Dielectric=C0G, Manufacturer 1="Samsung Electro-Mechanics", Manufacturer 2=YAGEO, Manufacturer Part Number 1=CL21C221JBANNNC, Manufacturer Part Number 2=CC0805JRNPO9BN221, Package=0805, Supplier Part Number 1=1276-1164-1-ND, Tolerance=5%, Voltage=50V, Supplier 1=DigiKey, Supplier 2=LCSC, Supplier Part Number 2=C107112
C2 C6 C7: library part CMP-001-00017-6, "Chip Capacitor, 100 nF, +/- 10%, 50 V, 0603 (1608 Metric)", Capacitor Type=Ceramic, Case/Package=0603, Max Operating Temperature=125°C, Min Operating Temperature=-55°C, Tolerance=10%, Voltage Rating=50V, Mounting Technology=SM, Pins=2, RoHS Compliant=True
C3 C5 C29: library part CMP-001-00005-6, "Chip Capacitor, 1 uF, +/- 10%, 25 V, 0603 (1608 Metric)", Capacitor Type=Ceramic, Case/Package=0603, Max Operating Temperature=125°C, Min Operating Temperature=-55°C, Tolerance=10%, Voltage Rating=25V, Mounting Technology=SM, Pins=2, RoHS Compliant=True
C4: library part CMP-001-00075-4, "Chip Capacitor, 10µF +/-20%, 10V, 0603, Thickness 1 mm", Case/Package=0603, Max Operating Temperature=85°C, Min Operating Temperature=-55°C, Tolerance=10%, Voltage Rating=10V, Mounting Technology=SMT, Pins=2
C8: library part CMP-001-00003-6, "Chip Capacitor, 1 uF, +/- 10%, 16 V, 0603 (1608 Metric)", Capacitor Type=Ceramic, Case/Package=0603, Max Operating Temperature=125°C, Min Operating Temperature=-55°C, Tolerance=10%, Voltage Rating=16V, Mounting Technology=SM, Pins=2, RoHS Compliant=True
C9 C10 C32: library part CMP-001-00081-4, "Chip Capacitor, 22µF +/-40%, 16V, 0805, Thickness 1.45 mm", Case/Package=0805, Max Operating Temperature=85°C, Min Operating Temperature=-55°C, Tolerance=5%, Voltage Rating=16V, Mounting Technology=SMT, Pins=2
C11 C12 C18 C22 C23A C23B C23C C23D C23E: library part "Capacitor 15uF, 20%, 35V, X5R, 0805-1", "Capacitor, ceramic, 15uF, 20%, 35V, X5R, 0805", Dielectric=X5R, Manufacturer 1="Cal-Chip Electronics", Manufacturer 2=TDK, Manufacturer Part Number 1=GMC21X5R156M35NT, Manufacturer Part Number 2=C2012X5R1V156MT000E, Package=0805, Supplier Part Number 1=4713-GMC21X5R156M35NTCT-ND, Tolerance=20%, Voltage=35V, Supplier 1=DigiKey, Supplier 2=LCSC, Supplier Part Number 2=C5367448
C13 C14 C15 C16 C17 C20A C20B C20C C20D C20E: library part CMP-001-00069-3, "Chip Capacitor, 10nF +/-20%, 50V, 0402, Thickness 0.6 mm", Case/Package=0402, Max Operating Temperature=85°C, Min Operating Temperature=-55°C, Tolerance=5%, Voltage Rating=50V, Mounting Technology=SMT, Pins=2
C19 C30 C31: library part CMP-001-00078-4, "Chip Capacitor, 1µF +/-40%, 50V, 0603, Thickness 1 mm", Case/Package=0603, Max Operating Temperature=85°C, Min Operating Temperature=-55°C, Tolerance=10%, Voltage Rating=50V, Mounting Technology=SMT, Pins=2
C21A C21B C21C C21D C21E: library part CMP-001-00060-4, "Chip Capacitor, 470nF +/-40%, 10V, 0402, Thickness 0.6 mm", Case/Package=0402, Max Operating Temperature=85°C, Min Operating Temperature=-55°C, Tolerance=20%, Voltage Rating=10V, Mounting Technology=SMT, Pins=2
C24 C25 C26 C27 C28: library part "Capacitor 82pF, 5%, 50V, C0G, 0603-1", "Capacitor, ceramic, 82pF, 5%, 50V, C0G, 0603", Dielectric=C0G, Manufacturer 1="Samsung Electro-Mechanics", Manufacturer 2=FH, Manufacturer Part Number 1=CL10C820JB81PND, Manufacturer Part Number 2=0603CG820J500NT, Package=0603, Supplier Part Number 1=1276-CL10C820JB81PNDCT-ND, Tolerance=5%, Voltage=50V, Supplier 1=DigiKey, Supplier 2=LCSC, Supplier Part Number 2=C1683
D1: library part CMP-019-00050-4, "Trans Voltage Suppressor Diode, 5V V(RWM), Unidirectional, 1 Element, Silicon", Max Operating Temperature=125°C, Min Operating Temperature=-40°C, Pins=6, RoHS Compliant=Yes
D2: library part CMP-00013-1, "TVS Diode, 6V Standoff, 600W, 60V V(RWM), Unidirectional, 1 Element, Silicon, DO-214AA", Case/Package=DO-214AA, Max Breakdown Voltage=10.3V, Max Operating Temperature=150°C, Min Breakdown Voltage=66.7V, Min Operating Temperature=-65°C, Non-rep Peak Rev Power Dis-Max=600W, Peak Reflow Temperature (Cel)=260°C, Rep Pk Reverse Voltage-Max=60V, Reverse Standoff Voltage=6.0V, Diode Element Material=SILICON, Diode Type="TRANS VOLTAGE SUPPRESSOR", JEDEC-95 Code=DO-214AA, JESD-30 Code=R-PDSO-C2, JESD-609 Code=e3, Moisture Sensitivity Level=1, Mounting Technology=SMT, Number of Elements=1, Pins=2, Polarity=Unidirectional, RoHS Compliant=Yes
D3: library part CMP-004-00058-1, "LED 0603 RED SMD", Design Item ID=LED_0603_RED, Source=Schematic-Lib-PhilsLab.SchLib
D4 D5 D6 D7 D8: library part CMP-004-00021-2, "Zener Diode, 3.6 V, 5 mA, -65 to 200 degC, 2-Pin DO-35, RoHS, Bulk", Case/Package=DO-35-2, Forward Voltage=1.5V, Manufacturer="Fairchild Semiconductor", Max Operating Temperature=200°C, Min Operating Temperature=-65°C, Package Description="2-Pin Through Hole Diode, Dia 1.72 mm, Body Length 3.805 mm", Package Quantity=1000, Power=500mW, Tolerance=6%, Datasheet URL=https://www.fairchildsemi.com/datasheets/BZ/BZX79C3V6.pdf, Datasheet Version="Rev. C1, 07/2007", Impedance=90Ohm, Manufacturer URL=https://www.fairchildsemi.com/, Mounting Technology=TH, Package Reference=DO-35-2, Package URL=https://www.fairchildsemi.com/package-drawings/DO/DO35A.pdf, Packaging=Bulk, Pins=2, RoHS Compliant=True
F1 F2: library part CMP-00012-1, "PTC Resettable Fuse, 8V, 0.5A hold, 1A trip, 0.15ohm, Surface Mount", Case/Package=1206, Current Rating=100A, Max Operating Temperature=85°C, Min Operating Temperature=-40°C, Package Height=0.55mm, Package Length=3.5mm, Package Width=1.8mm, Resistor Type="PTC THERMISTOR", Working Voltage=8V, JESD-609 Code=e3, Mounting Technology=SMT, Pins=2, Reach SVHC Compliant=Yes, Reference Standard=UL, RoHS Compliant=Yes, Terminal Finish=Tin
FB1: library part CMP-00024-1, "Ferrite Beads, 330Ohm 25% 100MHz, 50 mOhm DC, 2.5A, 0805", Case/Package=0805, Clock Frequency=100MHz, Current Rating=2.5A, DC Resistance (DCR)=50mΩ, Max Operating Temperature=125°C, Min Operating Temperature=-55°C, Tolerance=25%, Core Material=Ferrite, ESR=50mΩ, Impedance=330Ω, Max DC Current=2.5A, Min Width=1.05mm, Mounting Technology="Surface Mount", Pins=2, RMS Current (Irms)=2.5A, RoHS=Compliant, Termination=SMD/SMT, Test Frequency=100MHz
J1 J5 J6 J7 J8 J9 J10 J11 J12: library part "GX12-2 Jack-1", "2 pin GX12 aviation connector jack for throughhole soldering", Supplier 1=DigiKey, Supplier 2=LCSC
J2: library part CMP-002-00075-1, "Conn USB 2.0 Type C RCP 24 POS 0.3mm/0.5mm Solder RA SMD 24 Terminal 1 Port T/R"
J3: library part CMP-00030-00004-2, "2.54mm pitch pins footprint for HiLetgo W5500 breakout board (linked).", ComponentLink1Description=https://www.amazon.com/HiLetgo-Ethernet-Network-Interface-WIZ820io/dp/B08KXM8TKJ
J4 J17 J19 J20 J21 J22: library part CMP-2000-05181-2, "PC TEST POINT MINIATURE BLACK", Color=Black, Flammability Rating="UL94 V-0", Package Quantity=100, Body Material=Bronze, Contact Material=Bronze, Contact Plating=Silver, Diameter=2.54mm, Height=0.3inch, Hole Diameter=1.6mm, Housing Color=Black, Inside Diameter=1.27mm, Insulation=Insulated, Insulation Material=Nylon, Lead Free="Lead Free", Length=7.62mm, Material=Nylon, Mount="Through Hole", Number of Contacts=1, Number of Ports=1, Orientation=Straight, Outside Diameter=2.54mm, Packaging=Bulk, Plating=Silver, REACH SVHC="No SVHC", RoHS Compliant=Yes, Series=THM, Termination="Through Hole"
J13 J14 J15 J16: library part CMP-00011-2, "THT TEST POINT, HOOK"
J18: library part CMP-002-00206-1, "Socket; DC supply; XT30; male; PIN: 2; on PCBs; THT; Colour: yellow", Case/Package=None, Check_prices=https://www.snapeda.com/parts/XT30PW-M/AMASS/view-part/?ref=eda, Component Type=Standard, Design Item ID=XT30PW-M, MF=AMASS, MP=XT30PW-M, Pins=2, SnapEDA_Link=https://www.snapeda.com/parts/XT30PW-M/AMASS/view-part/?ref=snap, Source=XT30PW-M.SchLib
R1 R2 R3 R4 R5 R6 R12 R13 R14 R15 R16 R17 R18 R19 R20 R21 R22 R23 R24 R25 R27: library part "Resistor 750R, 0.1%, 1/8W, 0805-1", "Resistor, 750R, 0.1%, 1/8W, 0805", Manufacturer 1=YAGEO, Manufacturer 2=RESI, Manufacturer Part Number 1=RT0805BRD07750RL, Manufacturer Part Number 2=PTFR0805B750RP9, Package=0805, Power=1/8W, Supplier Part Number 1=YAG4940CT-ND, Tolerance=0.1%, Supplier 1=DigiKey, Supplier 2=LCSC, Supplier Part Number 2=C2849336
R7 R26: library part CMP-009-00017-5, "Chip Resistor, 10 KOhm, +/- 1%, 01 W, -55 to 155 degC, 0603 (1608 Metric)", Case/Package=0603, Max Operating Temperature=155°C, Min Operating Temperature=-55°C, Power=100mW, Tolerance=1%, Voltage Rating=50V, Mounting Technology=SM, Pins=2, RoHS Compliant=True
R8 R9: library part CMP-009-00196-2, "5.1 kOhms ±1% 0.1W, 1/10W Chip Resistor 0603 (1608 Metric) Thick Film", Case/Package=0603, Tolerance=1%
R10 R11 R46 R47: library part CMP-009-00063-2, "Jumper 0603 (1608 Metric)", Case/Package=0603, Mounting Technology=SMT, Pins=2
R28 R29 R30 R31 R32: library part CMP-009-00157-3, "Chip Resistor, 1 kOhms, +/-5 %, 63 mW, -55 to 155 degC, 0402", Case/Package=0402, Max Operating Temperature=155°C, Min Operating Temperature=-55°C, Power=63mW, Tolerance=5%, Pins=2
R33A R33B R33C R33D R33E: library part CMP-009-00066-2, "10K 0.063W 1% 0402 (1005 Metric)  SMD", Case/Package=0402, Power=63mW, Tolerance=1%, Mounting Technology=SMT, Pins=2
R34A R34B R34C R34D R34E: library part CMP-03412-045241-1, "Anti-Sulfurated Chip Resistors Automotive Grade 15Ω 1% 100ppm/°C 0603", Case/Package=0603, Max Operating Temperature=155°C, Max Power Dissipation=100mW, Min Operating Temperature=-55°C, Resistance=15R, Resistor Type="Thick Film", Temperature Coefficient=100ppm/°C, Tolerance=1%, Features="Moisture Resistant", Height=0.022inch, Length=0.063inch, Number of Terminations=2, Packaging="Tape and Reel", RoHS Compliant=Yes, Series=AF, Width=0.031inch
R35A R35B R35C R35D R35E: library part CMP-04015-046600-1, "2kΩ ±1% 0.063W, 1/16W Chip Resistor 0402 (1005 Metric) Moisture Resistant Thin Film"
R36A R36B R36C R36D R36E: library part CMP-009-00138-3, "Chip Resistor, 2 kOhms, +/-5 %, 63 mW, -55 to 155 degC, 0402", Case/Package=0402, Max Operating Temperature=155°C, Min Operating Temperature=-55°C, Power=63mW, Tolerance=5%, Pins=2
R37A R37B R37C R37D R37E: library part CMP-009-00252-1, "No Description Available", Manufacturer_Name="ROHM Semiconductor", Copyright="Copyright (C) 2026 Ultra Librarian. All rights reserved.", Design Item ID=RRH100P03GZETB, Manufacturer_Part_Number=RRH100P03GZETB, RefDes=RefDes, Source=RRH100P03GZETB.SchLib, Type=Type
R38A R38B R38C R38D R38E: library part CMP-009-00145-3, "Chip Resistor, 3 kOhms, +/-1 %, 63 mW, -55 to 155 degC, 0402", Case/Package=0402, Max Operating Temperature=155°C, Min Operating Temperature=-55°C, Power=63mW, Tolerance=1%, Pins=2
R39A R39B R39C R39D R39E: library part CMP-03211-002910-1, "CRGP0402 820KΩ 0.125W ±100ppm/°C 1% 50V", Manufacturer=TE, Manufacturer Part Number=CRGP0402F820K, Package=CRGP0402, Power Rating=0.125W, Resistance=820KΩ, Temperature="-55°C to +155°C", Temperature Coefficient=±100ppm/°C, Temperature Range High=+155°C, Temperature Range Low=-55°C, Tolerance=0.01, Voltage Rating=50V, Automotive=No, Category=Res, ComponentLink2Description=Datasheet, ComponentLink2URL=https://www.mouser.ca/datasheet/2/418/NG_DS_9-1773463-9_A-1358566.pdf, Composition="Thick Film", Device Class L1="Passive Components", Device Class L2=Resistors, Device Class L3="Chip SMD Resistors", Height=0.4mm, Ipc Land Pattern Name=RESC11050X35, Lead Free=Yes, Octopart=https://octopart.com/crgp0402f820k-te+connectivity-91018714, RoHS=TRUE, Series=CRGP
R40 R41 R42 R43 R44: library part CMP-009-00093-2, "316K 0.063W 1% 0402 (1005 Metric)  SMD", Case/Package=0402, Power=63mW, Tolerance=1%, Mounting Technology=SMT, Pins=2
R45: library part CMP-009-00023-5, "Chip Resistor, 100 KOhm, +/- 1%, 0.1 W, -55 to 155 degC, 0603 (1608 Metric)", Case/Package=0603, Max Operating Temperature=155°C, Min Operating Temperature=-55°C, Power=100mW, Tolerance=1%, Voltage Rating=50V, Mounting Technology=SM, Pins=2, RoHS Compliant=True
R48: library part CMP-009-00297-1, "Chip Resistor, 470 Ohm, +/-1%, 0.1 W, -55 to 155 degC, 0603 (1608 Metric)", Case/Package=0603, Max Operating Temperature=155°C, Min Operating Temperature=-55°C, Power=100mW, Tolerance=1%, Voltage Rating=50V, Mounting Technology=SM, Pins=2, RoHS Compliant=True
SW1 SW2: library part CMP-00014-1, "Button, through-hole, right-angle, long", Actuator Color=Black, Contact Current(DC)-Max=50mA, Contact DC Max Rating R Load=0.05A@12VDC, Contact Resistance=0.1mR, Contact Voltage(DC)-Max=12V, Dielectric Withstand Volts=250VACV, Insulation Resistance=100MR, Manufacturer Series=431256, Max Operating Temperature=85°C, Min Operating Temperature=-40°C, Actuator Length=0.229inch, Actuator Material=Polymer, Actuator Type=Pushbutton, Body Breadth=7.1882mm, Body Height=6.5532mm, Body Length or Diameter=7.3914mm, Center Contact Plating=Silver, Contact Material="Stainless Steel", End Contact Material="Stainless Steel", End Contact Plating=Silver, Housing Material=Polymer, Mounting Technology="Through Hole", PCB Hole Count=4, Reach SVHC Compliant=Yes, RoHS Compliant=Yes, Solderability=WAVE, Switch Function=SPST, Switch Type=Keypad, Terminal Length=0.138inch, Terminal Material="Copper Alloy", Termination=Solder
U1 U2 U6 U7 U8 U9 U10 U11 U12: library part CMP-2000-07553-1, "TVS Array - Asymmetrical Data Line Protector, 600 W, 7.5 V, -55 to 150 degC, 3-Pin SOT23, RoHS, Tape and Reel", Capacitance=75pF, Case\/Package=SOT-23, Clamping Voltage=17V, Current=20uA, Manufacturer="Protek Devices", Max Operating Temperature=150degC, Min Breakdown Voltage=7.5V, Min Operating Temperature=-55degC, Package Description="3-Pin Small Outline Transistor, Body 2.92 x 1.3 mm, Pitch 0.94 mm", Package Reference=SOT23-3, Power Dissipation=600W, Voltage=12V, Working Voltage=7V, Datasheet URL=www.protekdevices.com/xyz/documents/datasheets/psm712.pdf, Datasheet Version=10/2013, Depth=1.4mm, Direction=Bidirectional, Element Configuration=Dual, Lead Free=LeadFree, Leakage Current=20uA, Length=3.04mm, Manufacturer URL=http://www.protekdevices.com/, Mounting Technology=SurfaceMount, Number of Pins=3, Packaging=TapeandReel, Radiation Hardening=No, RoHSCompliant=True
U3: library part CMP-118-000000-2, "Bluetooth, WiFi 802.11b/g/n, Bluetooth v5.0 Transceiver Module 2.4GHz PCB Trace Surface Mount", Package="NON STANDARD Espressif Systems", Check_prices=https://www.snapeda.com/parts/ESP32S3WROOM1N16R2/Espressif+Systems/view-part/?ref=eda, Component Type=Standard, Design Item ID=ESP32-S3-WROOM-1-N16R2, MF="Espressif Systems", MP=ESP32S3WROOM1N16R2, Pin Count=39, SnapEDA_Link=https://www.snapeda.com/parts/ESP32S3WROOM1N16R2/Espressif+Systems/view-part/?ref=snap, Source=ESP32-S3-WROOM-1-N16R2.SchLib
U4: library part CMP-04912-000029-1, "IC PWR SWITCH P-CHAN 1:1 SOT23-6", Case/Package=SOT-23-6, Max Operating Temperature=125°C, Max Output Current=2A, Min Operating Temperature=-40°C, Fault Protection="Reverse Current", Interface=On/Off, Number of Channels=1, Number of Outputs=1, Output Configuration="High Side", Packaging="Tape and Reel"
U5: library part CMP-019-00074-10, "Automotive, 500mA, low-noise ultra-low-IQ high-PSRR low-dropout (LDO) voltage regulator 8-SON -40 to 125"
U13: library part CMP-033-000003-1, "True 16-bit, 8-channel, SPI, voltage-output DAC with precision internal reference 16-WQFN -40 to 125", Manufacturer_Name="Texas Instruments", Copyright="Copyright (C) 2026 Ultra Librarian. All rights reserved.", Datasheet=https://www.ti.com/lit/gpn/dac80508, Design Item ID=DAC80508ZCRTER, Manufacturer_Part_Number=DAC80508ZCRTER, RefDes=RefDes, Source=DAC80508ZCRTER.SchLib, Type=TYPE
U14A U14B U14C U14D U14E: library part CMP-009-00251-1, "Voltage-to-current converter/transmitter with 3-V to 15-V regulator and resistor set I/O ratio 10-VSON -40 to 125", Case/Package=DRC0010A, Manufacturer="Texas Instruments", PartNumber=XTR111AIDRCT, CompType=IC, Copyright="Copyright (C) 2025 Ultra Librarian. All rights reserved.", Design Item ID=XTR111AIDRCR, Manufacturer_Name="Texas Instruments", Manufacturer_Part_Number=XTR111AIDRCR, MountType=SMT, RefDes=RefDes, RoHS=Y, Source=XTR111AIDRCR.SchLib, Type=TYPE
U15A U15B U15C U15D U15E: library part CMP-256-000000-1, "50ppm/Â°C drift, 50ÂµA Iq in SOT-23-3 package series voltage reference 3-SOT-23 -40 to 125", Manufacturer_Name="Texas Instruments", Copyright="Copyright (C) 2025 Ultra Librarian. All rights reserved.", Design Item ID=REF3040AIDBZT, Manufacturer_Part_Number=REF3040AIDBZT, RefDes=RefDes, Source=REF3040AIDBZT.SchLib, Type=Type
U16: library part CMP-019-00081-3, "5.5-V, 2-A, 80-mΩ , 10-nA leakage load switch adj. rise time and adj output discharge 6-SOT-23 -45 to 125, EN Active Low", RoHS Compliant=Yes